# Altium PCB PHASE_SHIFTER.PcbDoc (part 1 of 2)
Units mm, origin at the board's own origin, x right, y up, seen from the top; angles counter-clockwise.
Board outline 49.45 x 41.36 mm, 4 copper layers (Top Layer, GND, signal, Bottom Layer), stack 0.746 mm thick; 108 components, 104 nets, 427 pads, 760 vias.
Unrouted connection lines stored in the file: 109.
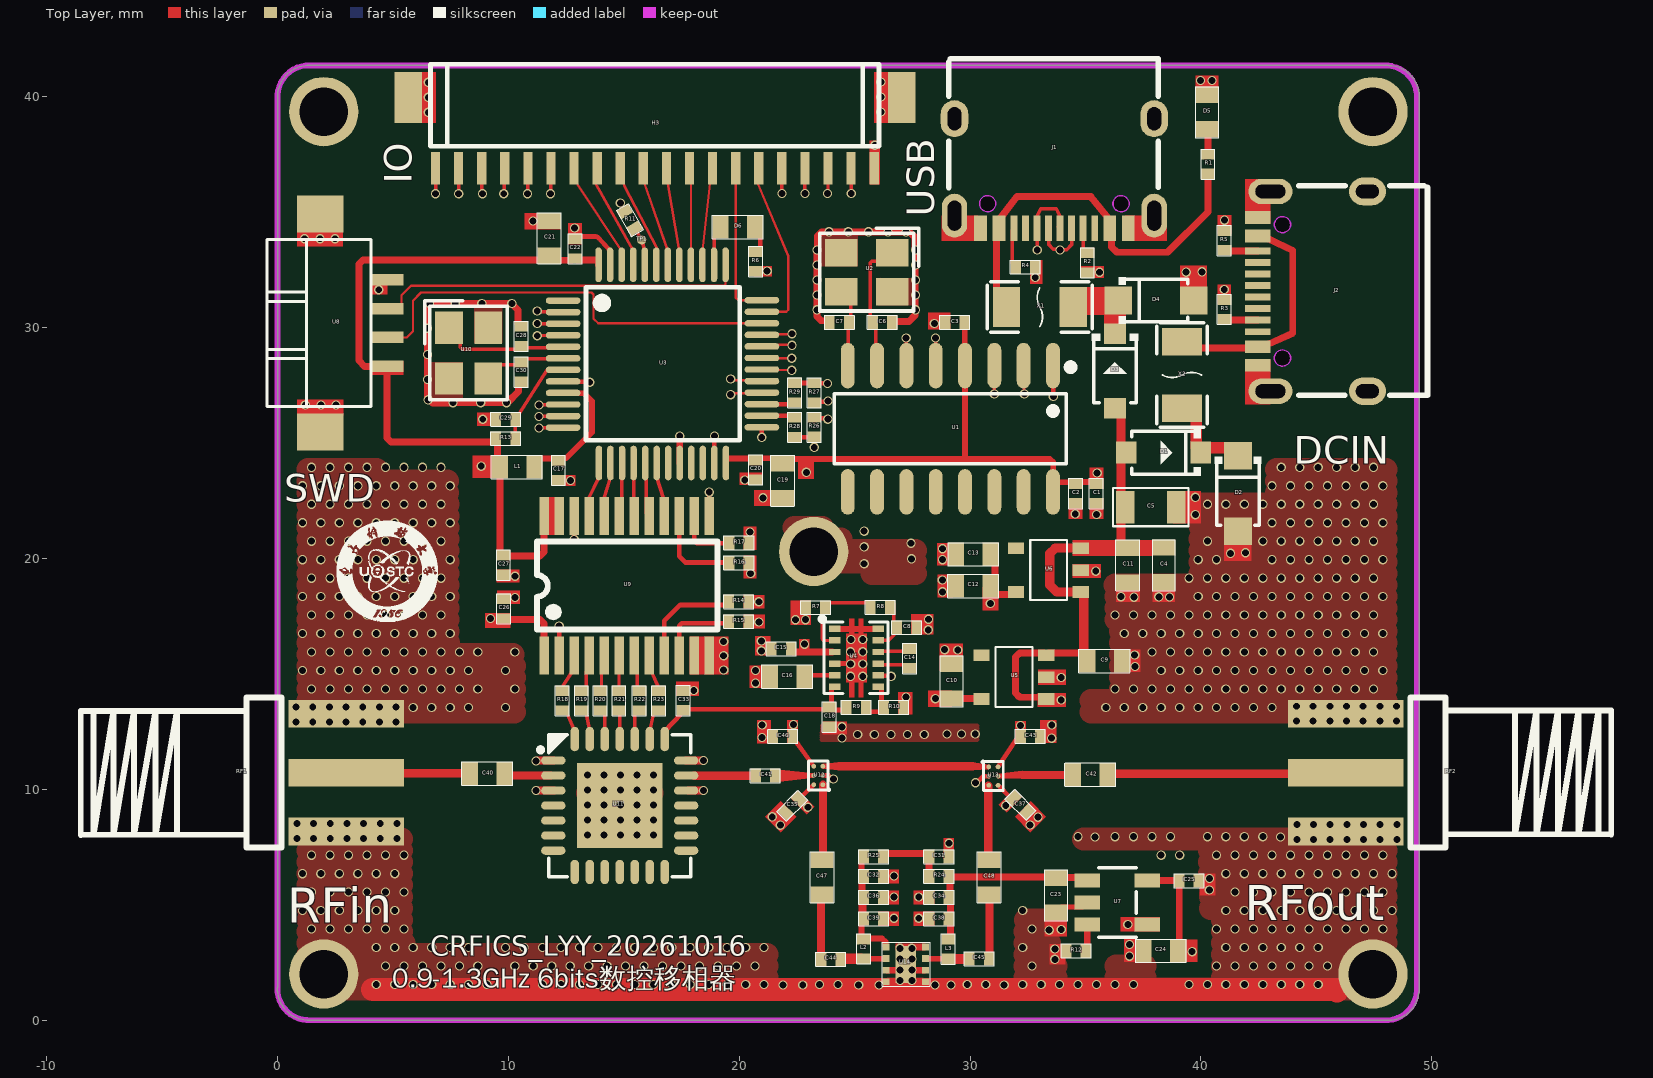
[diagram p0: Top Layer view]
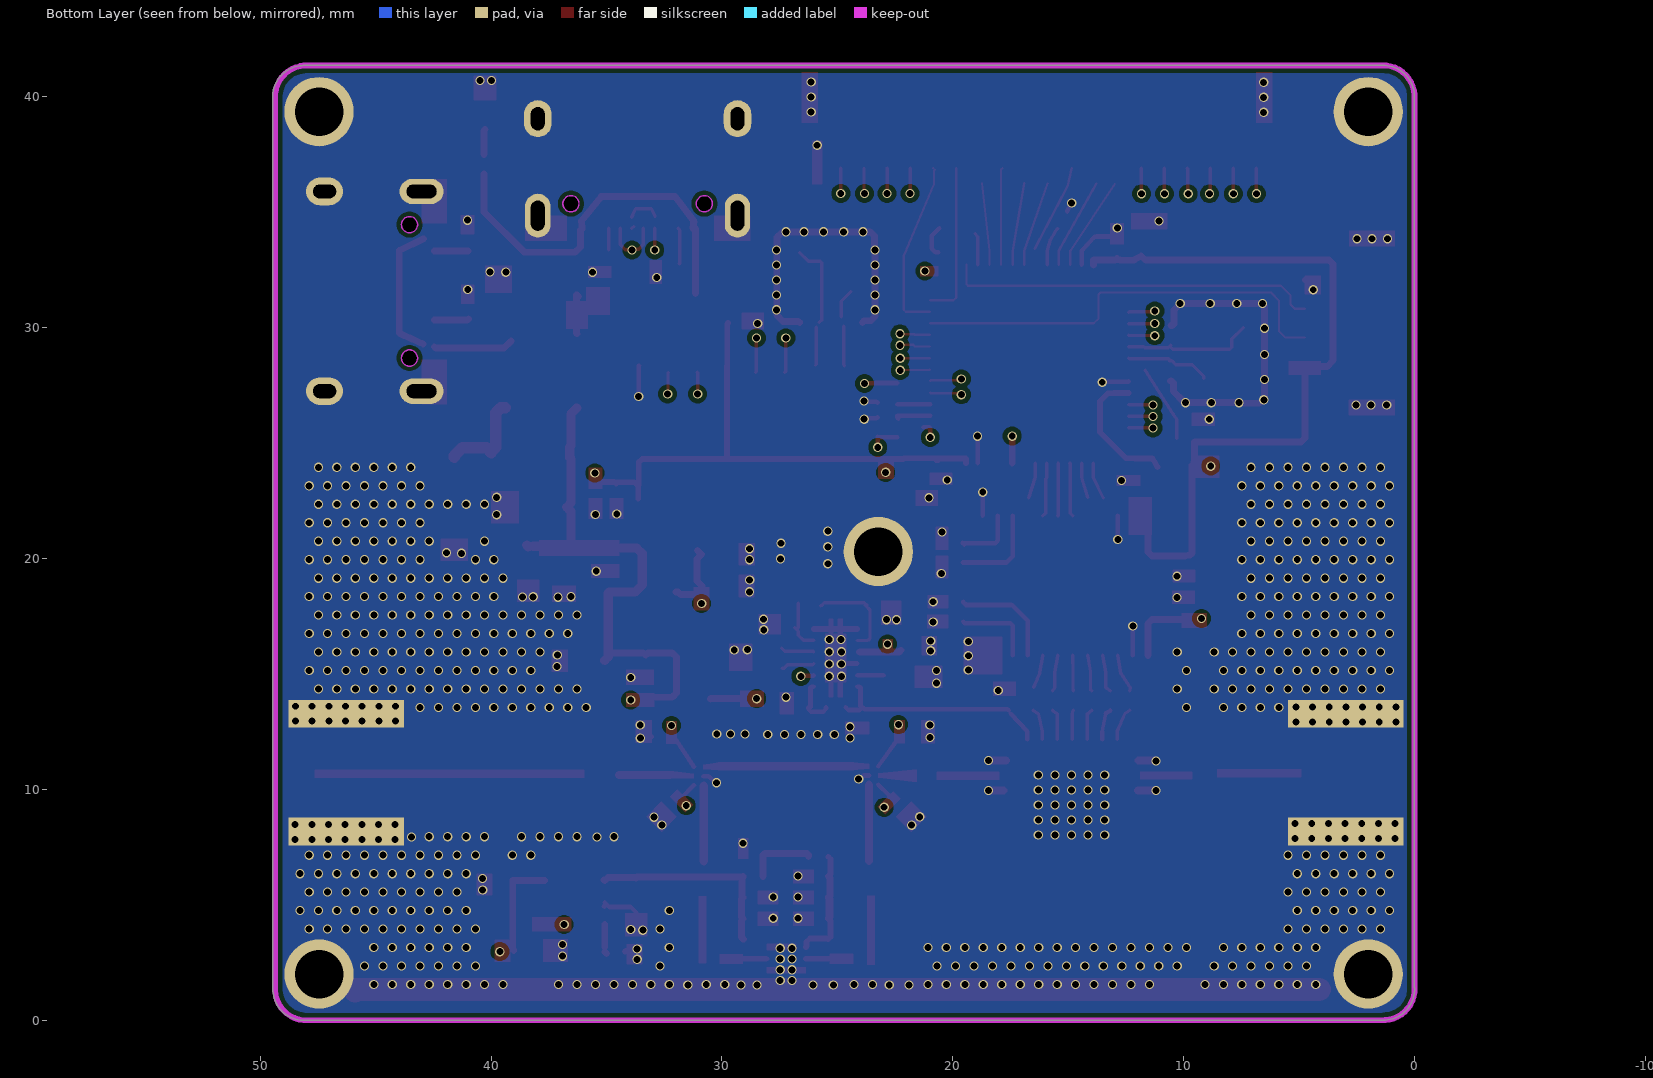
[diagram p1: Bottom Layer view, seen from below]
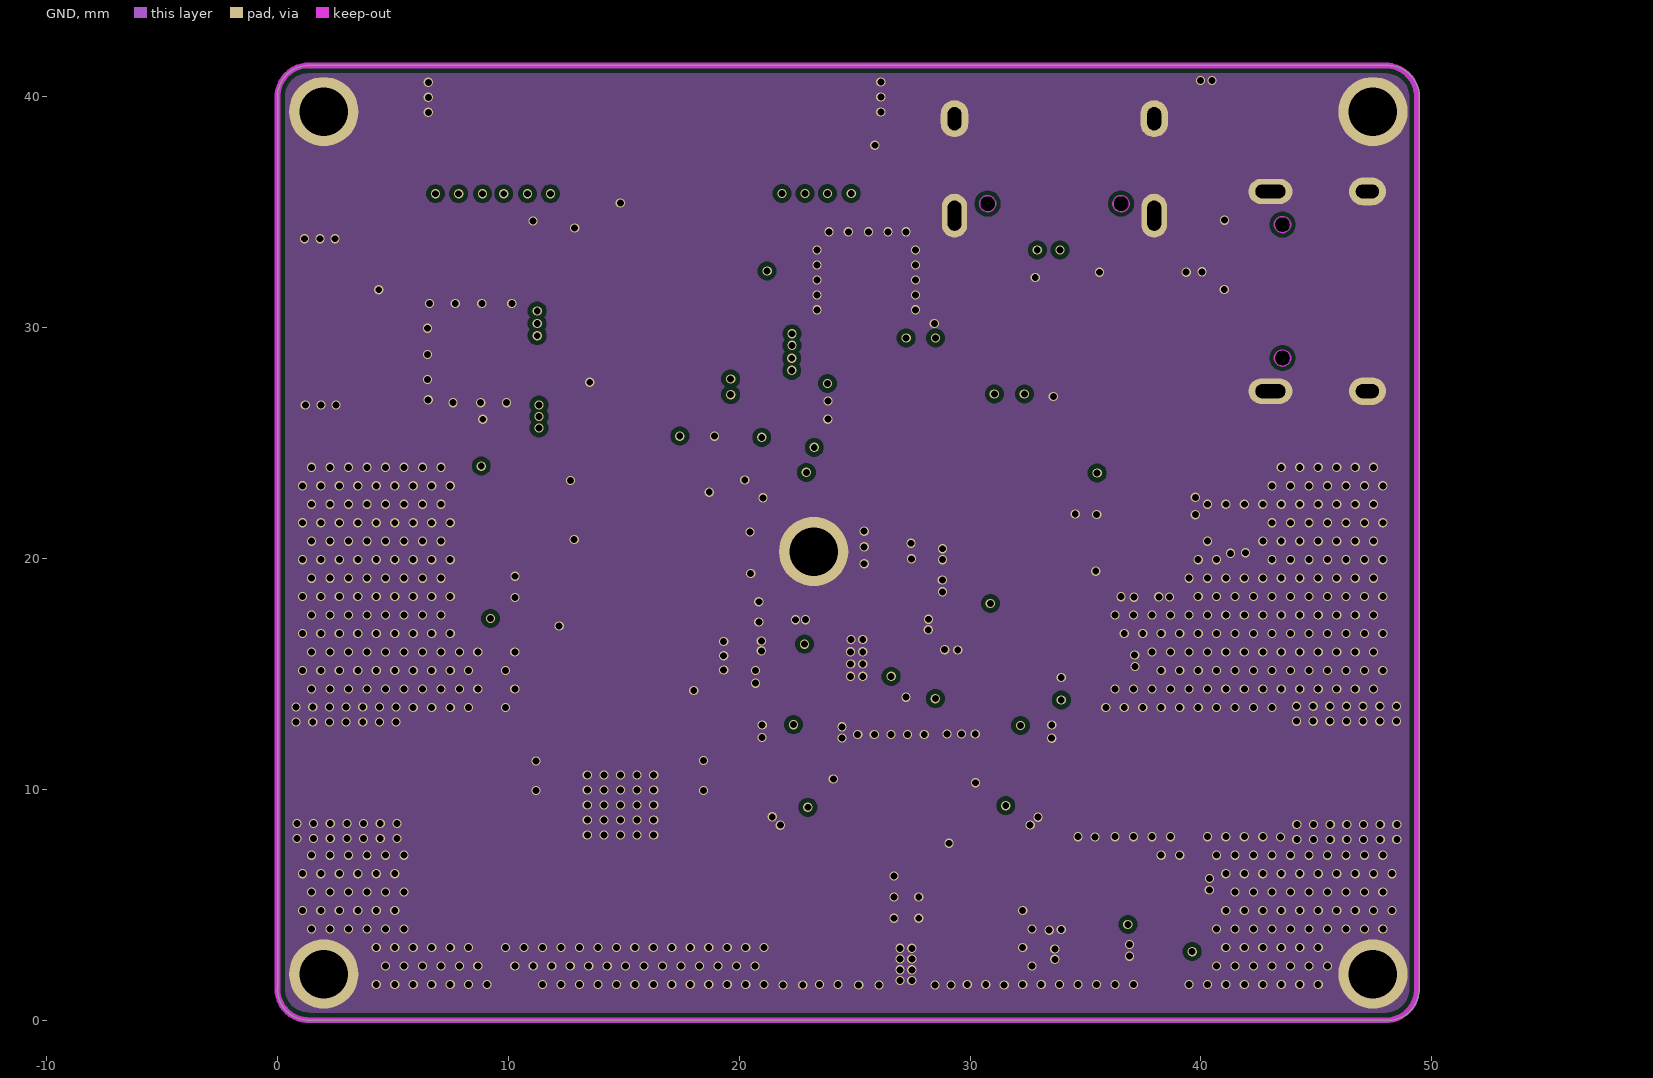
[diagram p2: GND]
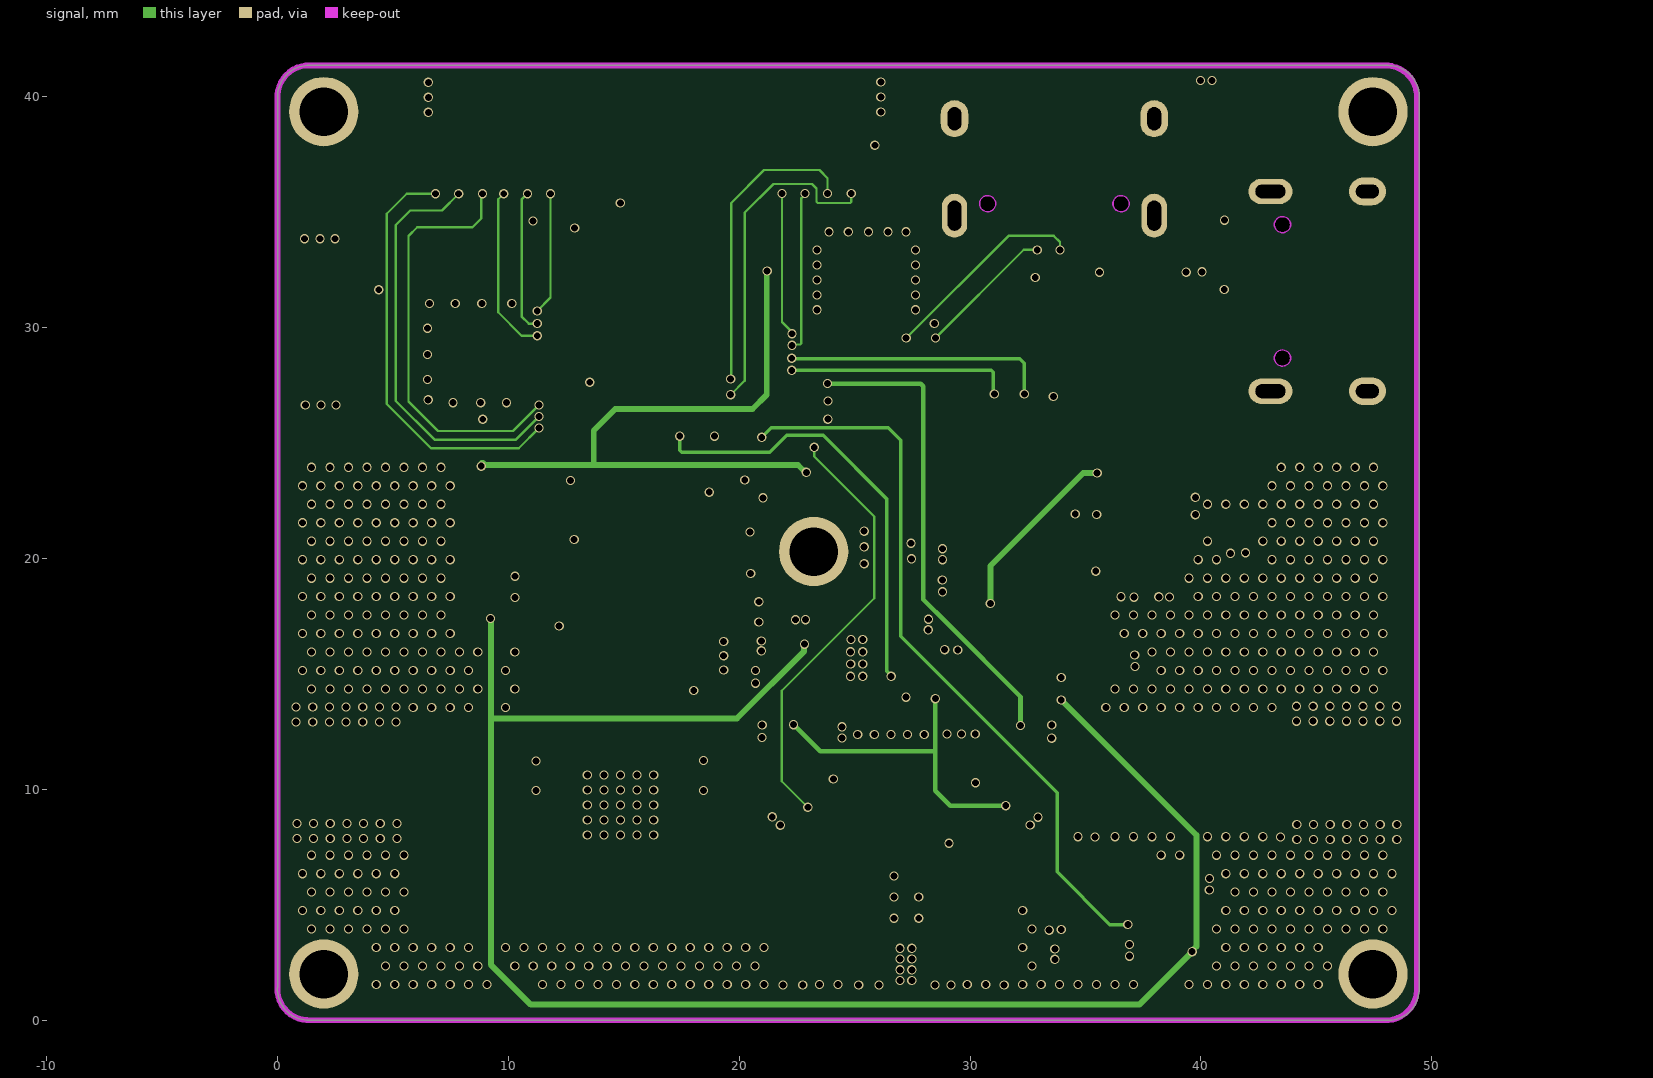
[diagram p3: signal]

## Layer stack, top to bottom
Top Solder: solder mask 0.0102, Solder Resist, Dk 3.5
Top Layer: signal copper 0.035
Dielectric 2: prepreg 0.2184, PP-023, Dk 4.5
GND: signal copper 0.018
Dielectric 1: core 0.2032, Core-024, Dk 4.6
signal: signal copper 0.018
Dielectric 3: prepreg 0.2184, PP-023, Dk 4.5
Bottom Layer: signal copper 0.035
Bottom Solder: solder mask 0.0102, Solder Resist, Dk 3.5

## Board outline
1.278,0.003 cw(c1.346,1.35) 0,1.418 0.004,1.418 0.001,40.078 0.003,40.078 cw(c1.35,40.011) 1.418,41.357 48.125,41.357 48.175,41.35 cw(c48.107,40.004) 49.453,39.936 49.45,39.936 49.45,1.275 cw(c48.104,1.343) 48.036,-0.003 48.1,0

## Design rules (kind name [scope] priority, off if disabled: settings)
Clearance Clearance_1 [InNamedPolygon('NONET_L-01_P-003')] p1: gap=0.58 ignorepadtopadclearanceinfootprint=FALSE except(0: Arc-Text Arc-Hole Track-Text Track-Hole SMDPad-Text SMDPad-Hole THPad-Text THPad-Hole Via-Text Via-Hole Fill-Text Fill-Hole Poly-Text Poly-Hole Region-Text Region-Hole Text-Text Text-Hole; 0.4: Arc-Arc Arc-Track Arc-SMDPad Arc-THPad Arc-Via Track-Track Track-SMDPad Track-THPad Track-Via SMDPad-SMDPad SMDPad-THPad SMDPad-Via THPad-THPad THPad-Via Via-Via; 0.7: Arc-Fill Arc-Poly Arc-Region Track-Fill Track-Poly Track-Region)
Clearance Clearance_2 [InNamedPolygon('NONET_L-01_P-003')] p2: gap=0.7 ignorepadtopadclearanceinfootprint=FALSE except(0: Arc-Hole Track-Hole SMDPad-Hole THPad-Hole Via-Hole Fill-Hole Poly-Hole Region-Hole Text-Hole; 0.3: Arc-Via Track-Via SMDPad-Via THPad-Via Via-Via)
Clearance GND_Bottom [InNamedPolygon('GND_Bottom')] p3: gap=0.2 ignorepadtopadclearanceinfootprint=TRUE
Clearance Ch341_3V3 [InNamedPolygon('CH341_3V3')] p4: gap=0.5 ignorepadtopadclearanceinfootprint=TRUE
Clearance VSS [InNamedPolygon('VSS')] p5: gap=0.2 ignorepadtopadclearanceinfootprint=TRUE except(0.6: Arc-Fill Arc-Poly Arc-Region Track-Fill Track-Poly Track-Region Fill-Fill Fill-Poly Fill-Region Poly-Poly Poly-Region Region-Region)
Clearance GND [InNamedPolygon('GND_Ploy')] p6: gap=0.4 ignorepadtopadclearanceinfootprint=TRUE except(0.8: Arc-Fill Arc-Poly Arc-Region Track-Fill Track-Poly Track-Region Fill-Fill Fill-Poly Fill-Region Poly-Poly Poly-Region Region-Region)
Clearance DC_GND [InNamedPolygon('DC_Ploy')] p7: gap=0.4 ignorepadtopadclearanceinfootprint=TRUE except(0.8: Arc-Fill Arc-Poly Arc-Region Track-Fill Track-Poly Track-Region Fill-Fill Fill-Poly Fill-Region Poly-Poly Poly-Region Region-Region)
Clearance LNA [InNamedPolygon('LNA')] p8: gap=0.102 ignorepadtopadclearanceinfootprint=TRUE except(0.2: Arc-Arc Arc-Track Track-Track SMDPad-Fill SMDPad-Poly SMDPad-Region THPad-Fill THPad-Poly THPad-Region; 0.8: Arc-Fill Arc-Poly Arc-Region Track-Fill Track-Poly Track-Region Via-Fill Via-Poly Via-Region Fill-Fill Fill-Poly Fill-Region Poly-Poly Poly-Region Region-Region)
Clearance Ploy [InPolygon] p9: gap=0.2 ignorepadtopadclearanceinfootprint=TRUE
Clearance Diff [InNetClass('Diff')] p10: gap=0.152 ignorepadtopadclearanceinfootprint=TRUE
Clearance [All] p11: gap=0.1 ignorepadtopadclearanceinfootprint=TRUE except(0.102: SMDPad-SMDPad; 0.203: SMDPad-THPad)
ComponentClearance [All] p1: gap=0.1 collisioncheckmode=3 verticalgap=0.1 showdistances=FALSE donotcheckwithout3dbody=TRUE
DiffPairsRouting [All] p1: maxlimit=10 minlimit=0.1 mostfreqgap=0.178 toplayer_minwidth=0.128 toplayer_maxwidth=1.016 toplayer_prefwidth=0.422 midlayer1_minwidth=0.128 midlayer1_maxwidth=1.016 midlayer1_prefwidth=0.422 midlayer2_maxgap=0.254 midlayer2_minwidth=0.128 midlayer2_maxwidth=0.381 midlayer2_prefwidth=0.29 bottomlayer_minwidth=0.128 bottomlayer_maxwidth=1.016 bottomlayer_prefwidth=0.422 maxuncoupledlength=12.7
HoleSize [All] p1: absolutevalues=TRUE maxlimit=5 minlimit=0.025 maxpercent=80.000 minpercent=20.000
HoleToHoleClearance [All] p1: gap=0 allowstackedmicrovias=TRUE
MatchedLengths [InNetClass('DRM')] p1: tolerance=1.27 checknetsindiffpair=FALSE checkdiffpairvsdiffpair=TRUE checkxsignals=TRUE checkothers=TRUE
MinimumSolderMaskSliver [All] p1: minsoldermaskwidth=0
PlaneConnect [All] p1: planeconnectstyle=Direct reliefexpansion=0.508 reliefentries=4 reliefconductorwidth=0.254 reliefairgap=0.254
PolygonConnect [All] p1: connectstyle=Direct reliefconductorwidth=0.254 reliefentries=4 polygonreliefangle="90 Angle" airgapwidth=0.254
RoutingVias [All] p1: holewidth=0.711 width=1.27 viastyle="Through Hole" minholewidth=0.2 minwidth=0.1 maxholewidth=2.4 maxwidth=5
SilkToSilkClearance [All] p1: silktosilkclearance=0
SilkToSolderMaskClearance [IsPad] p1: minsilkscreentomaskgap=0 clearancetoexposedcopper=TRUE
SolderMaskExpansion [IsVia] p1: expansion=0.102 istentingtop=TRUE
SupplyNets "Schematic Supply Nets_1" [InNet('GND')] p1: voltage=0.000
SupplyNets "Schematic Supply Nets" [InNet('3V3')] p2: voltage=0.000
Width [All] p1: maxlimit=5 minlimit=0.1 preferedwidth=0.1 midlayer1_maxwidth=2 midlayer2_maxwidth=0.254 bottomlayer_maxwidth=0.254 minimp=50.000000 maximp=50.000000 favimp=50.000000
22 further rules are at their usual default settings.

## Components (designator, comment, footprint, x,y, rotation, side; value= is the part's Value field where it differs from the comment)
C1 "0.1uF" 0402_Z 35.475,22.825 r270 top value="20pF  NP0"
C2 "0.1uF" 0402_Z 34.581,22.828 r270 top value="20pF  NP0"
C3 "10nF" 0402_Z 29.35,30.222 r180 top value="20pF  NP0"
C4 "10uF" 0603_Z 38.375,19.705 r270 top value="20pF  NP0"
C5 "47uF" 0805 37.825,22.225 r180 top value="20pF  NP0"
C6 "33pF" 0402_Z 26.211,30.222 r180 top value="20pF  NP0"
C7 "33pF" 0402_Z 24.328,30.234 r0 top value="20pF  NP0"
C8 "2.2uF" 0402_Z 27.262,17.003 r180 top value="20pF  NP0"
C9 "1uF" 0603_Z 35.812,15.584 r180 top value=100pF
C10 "1uF" 0603_Z 29.175,14.675 r270 top value=100pF
C11 "1uF" 0603_Z 36.84,19.725 r90 top value=100pF
C12 "100nF" 0603_Z 30.15,18.795 r0 top value=100pF
C13 "1uF" 0603_Z 30.15,20.17 r0 top value=100pF
C14 "1uF" 0402_Z 27.39,15.675 r270 top value="20pF  NP0"
C15 "2.2uF" 0402_Z 21.826,16.088 r180 top value="20pF  NP0"
C16 "4.7uF" 0603_Z 22.071,14.898 r180 top value="20pF  NP0"
C17 "1uF" 0402_Z 12.175,23.825 r270 top value="20pF  NP0"
C18 "2.2uF" 0402_Z 23.9,13.125 r90 top value="20pF  NP0"
C19 "4.7uF" 0603_Z 21.884,23.388 r90 top value="20pF  NP0"
C20 "100nF" 0402_Z 20.71,23.829 r90 top value="20pF  NP0"
C21 "4.7uF" 0603_Z 11.783,33.882 r90 top value="20pF  NP0"
C22 "100nF" 0402_Z 12.885,33.411 r90 top value="20pF  NP0"
C23 "1uF" 0603_Z 33.7,5.4 r270 top value=100pF
C24 "10uF" 0603_Z 38.25,3.025 r180 top value=100pF
C25 "0.1uF" 0402_Z 39.475,6.05 r0 top value=100pF
C26 "100nF" 0402_Z 9.806,17.834 r270 top value="20pF  NP0"
C27 "100nF" 0402_Z 9.781,19.709 r90 top value="20pF  NP0"
C28 "10pF" 0402_Z 10.562,29.634 r270 top value="20pF  NP0"
C29 "1uF" 0402_Z 9.891,26.031 r180 top value="20pF  NP0"
C30 "10pF" 0402_Z 10.55,28.069 r90 top value="20pF  NP0"
C31 "100 pF" 0402_Z 28.661,7.079 r180 top value=100pF
C32 "100nF" 0402_Z 25.811,6.242 r0 top value=100pF
C33 "10nF" 0402_Z 17.581,13.859 r270 top value="20pF  NP0"
C34 "100nF" 0402_Z 28.661,5.317 r180 top value=100pF
C35 "100 pF" 0402_Z 22.306,9.291 r225 top value=100pF
C36 "1nF" 0402_Z 25.811,5.329 r0 top value=100pF
C37 "100 pF" 0402_Z 32.172,9.336 r315 top value=100pF
C38 "100 pF" 0402_Z 28.661,4.392 r180 top value=100pF
C39 "100 pF" 0402_Z 25.811,4.404 r0 top value=100pF
C40 "100nF" 0603_Z 9.1,10.675 r0 top value="20pF  NP0"
C41 "100 pF" 0402_Z 21.125,10.6 r0 top value=100pF
C42 "100nF" 0603_Z 35.225,10.625 r0 top value="20pF  NP0"
C43 "100 pF" 0402_Z 32.603,12.302 r0 top value=100pF
C44 "100 pF" 0402_Z 23.961,2.642 r0 top value=100pF
C45 "100 pF" 0402_Z 30.386,2.667 r0 top value=100pF
C46 "100 pF" 0402_Z 21.899,12.288 r180 top value=100pF
C47 "NC" 0603_Z 23.6,6.2 r90 top
C48 "NC" 0603_Z 30.825,6.2 r90 top
D1 "B5819W" BW5819W 38.378,24.586 r0 top
D2 "SMF5.0A" SMF5.0A 41.601,22.813 r270 top
D3 "B5819W" BW5819W 36.275,28.125 r90 top
D4 "SMF5.0A" SMF5.0A 38.048,31.173 r0 top
D5 "LED0" 0603_Z 40.25,39.325 r270 top
D6 "LED1" 0603_Z 19.95,34.35 r0 top
H3 "HEADER20" Header20 16.575,39.6 r90 top
J1 "typec_16pin" TYPEC_16PIN 33.523,37.564 r180 top
J2 "typec_16pin" TYPEC_16PIN 45.725,31.7 r90 top
L1 "bead" 0603_Z 10.362,23.972 r180 top value=33nH
L2 "18nH" 0402_Z 25.4,3.1 r270 top value=10mH
L3 "47nH" 0402_Z 29.061,3.092 r270 top value=10mH
R1 "10k" 0402_Z 40.3,37.075 r90 top
R2 "5.1k" 0402_Z 35.078,32.802 r90 top
R3 "5.1k" 0402_Z 41.019,30.8 r270 top
R4 "5.1k" 0402_Z 32.406,32.621 r180 top
R5 "5.1k" 0402_Z 41.019,33.781 r270 top
R6 "10k" 0402_Z 20.709,32.855 r90 top
R7 "310k" 0402_Z 23.3,17.886 r0 top
R8 "100k" 0402_Z 26.102,17.891 r0 top
R9 "100k" 0402_Z 25.075,13.55 r180 top
R10 "310k" 0402_Z 26.7,13.55 r180 top
R11 "10k" 0402_Z 15.25,34.65 r120 top
R12 "38k" 0402_Z 34.6,3 r180 top value=1K
R13 "10k" 0402_Z 9.873,25.206 r0 top
R14 "0" 0402_Z 19.984,18.128 r180 top
R15 "0" 0402_Z 19.984,17.263 r180 top
R16 "10k" 0402_Z 19.984,19.819 r0 top
R17 "10k" 0402_Z 19.984,20.684 r0 top
R18 "22" 0402_Z 12.331,13.834 r90 top
R19 "22" 0402_Z 13.166,13.834 r90 top
R20 "22" 0402_Z 13.976,13.834 r90 top
R21 "22" 0402_Z 14.786,13.834 r90 top
R22 "22" 0402_Z 15.671,13.834 r90 top
R23 "22" 0402_Z 16.506,13.834 r90 top
R24 "6.5k" 0402_Z 28.661,6.229 r180 top value=1K
R25 "50" 0402_Z 25.811,7.092 r0 top value=1K
R26 "2k" 0402_Z 23.257,25.7 r270 top
R27 "2k" 0402_Z 23.244,27.166 r90 top
R28 "1k" 0402_Z 22.4,25.675 r90 top
R29 "1k" 0402_Z 22.412,27.191 r270 top
RF1 "BWIPX-1-001E" SMA-SMD_BWSMA-KE-P001 2.975,10.725 r180 top
RF2 "BWIPX-1-001E" SMA-SMD_BWSMA-KE-P001 46.275,10.725 r0 top
TP1 "TP_P" TP_0.8 15.775,33.8 r45 top
U1 "CH340G" CH340G 29.146,25.621 r180 top
U2 "12MHz" CRYSTAL-SMD_4P-L3.2-W2.5-BL 25.525,32.4 r180 top
U3 "CS32F030C8T6" LQPF48 16.678,28.428 r270 top
U4 "LM27762DSSR" LM27762 25.075,15.7 r270 top
U5 "SGM2036-2.8V" SOT-23-5 31.898,14.864 r180 top
U6 "SGM2036-3.3YN5G/TR" SOT-23-5 33.395,19.5 r180 top
U7 "SGM2576" SGM2576 36.375,5.1 r0 top
U8 "HDGC1251WR-4P" J4_1.25 3.3,30.2 r270 top
U9 "AiP74LVC8T245TA24.TR" AIP74LVC8T245TA24.TR 15.125,18.825 r0 top
U10 "8MHz" CRYSTAL-SMD_4P-L3.2-W2.5-BL 8.275,28.9 r270 top
U11 "XT3301Q6" XT3301Q6 14.825,9.3 r270 top
U12 "MXD8625C" MXD8625C 23.098,10.757 r0 top
U13 "MXD8625C" MXD8625C 31.338,10.416 r180 top
U14 "FW1103" FW1103W 27.211,2.417 r270 top
X1 "Fuse" F1206 33.022,30.886 r180 top
X2 "Fuse" F1206 39.175,27.95 r90 top

## Footprints (in the part's own frame and the unit in brackets; to place one, negate y for a bottom-side part, rotate by r counter-clockwise, add the part's x,y. Pads: shape width x height; smd on the part's side, far side on the other; paste and mask are expansions set on the pad)
0402_Z [mm]
  rect 0.45x0.6 smd mask+0: 1(0.434,-0.006) 2(-0.416,-0.006)
  silkscreen extent -0.64,-0.31 0.66,0.29, body extent -0.41,-0.31 0.44,0.29, height 0.25
0603_Z [mm]
  rect 0.7x1 smd mask+0: 1(0.735,0.013) 2(-0.765,0.013)
  silkscreen extent -1.12,-0.49 1.09,0.52
0805 [mm]
  rect 0.8x1.4 smd: 1(-1.1,0) 2(1.1,0)
  silkscreen extent -1.63,-0.83 1.64,0.83
AIP74LVC8T245TA24.TR [mm]
  rect 0.4x1.65 smd: 1(-3.575,-3.023) 2(-2.925,-3.023) 3(-2.275,-3.023) 4(-1.625,-3.023) 5(-0.975,-3.023) 6(-0.325,-3.023) 7(0.325,-3.023) 8(0.975,-3.023) 9(1.625,-3.023) 10(2.275,-3.023) 11(2.925,-3.023) 12(3.575,-3.023) 13(3.575,3.023) 14(2.925,3.023) 15(2.275,3.023) 16(1.625,3.023) 17(0.975,3.023) 18(0.325,3.023) 19(-0.325,3.023) 20(-0.975,3.023) 21(-1.625,3.023) 22(-2.275,3.023) 23(-2.925,3.023) 24(-3.575,3.023)
  silkscreen extent -3.89,-1.91 3.94,1.91
BW5819W [mm] "肖特基二极管"
  rect 0.88x0.96 smd: 1(-1.61,0) 2(1.61,0)
  silkscreen extent -1.38,-1 1.6,1
CH340G [mm]
  oval 0.602x1.971 smd: 1(-4.445,-2.736) 2(-3.175,-2.736) 3(-1.905,-2.736) 4(-0.635,-2.736) 5(0.635,-2.736) 6(1.905,-2.736) 7(3.175,-2.736) 8(4.445,-2.736) 9(4.445,2.736) 10(3.175,2.736) 11(1.905,2.736) 12(0.635,2.736) 13(-0.635,2.736) 14(-1.905,2.736) 15(-3.175,2.736) 16(-4.445,2.736)
  silkscreen extent -5.36,-2.82 5.03,1.52
CRYSTAL-SMD_4P-L3.2-W2.5-BL [mm]
  rect 1.4x1.2 smd paste+0 mask+0.051: 1(-1.1,-0.85) 2(1.1,-0.85) 3(1.1,0.85) 4(-1.1,0.85)
  silkscreen extent -2.26,-1.91 2.03,1.68
F1206 [mm] "保险丝"
  rect 1.19x1.728 smd paste+0 mask+0.051: 1(-1.445,0) 2(1.445,0)
  silkscreen extent -2.27,-1.09 2.27,1.09
FW1103W [mm]
  rect 1.6x0.9 smd mask+0: 0(0,0)
  rect 0.3x0.3 smd mask+0: 1(-0.75,-0.85) 2(-0.25,-0.85) 3(0.25,-0.85) 4(0.75,-0.85) 5(0.75,0.85) 6(0.25,0.85) 7(-0.25,0.85) 8(-0.75,0.85)
  round 0.1 on Top Overlay mask+0: ""(-1.036,-1.113)
  Top Layer region: -0.901,-0.45 -0.601,-0.45 -0.601,0.85 -0.901,0.85
  Top Layer region: -0.901,-0.45 -0.618,-0.45 -0.618,0.45 -0.901,0.45
  Top Layer region: 0.615,-0.45 0.898,-0.45 0.898,0.451 0.615,0.451
  Top Layer region: 0.1,-0.849 0.4,-0.849 0.4,0.851 0.1,0.851
  Top Layer region: 0.6,-0.85 0.9,-0.85 0.9,0.85 0.6,0.85
  silkscreen extent -0.96,-1.03 0.94,1.03
Header20 [mm]
  rect 1.4x0.4 smd: 1(-2.692,9.73) 2(-2.692,8.73) 3(-2.692,7.73) 4(-2.692,6.73) 5(-2.692,5.73) 6(-2.692,4.73) 7(-2.692,3.73) 8(-2.692,2.73) 9(-2.692,1.73) 10(-2.692,0.73) 11(-2.692,-0.27) 12(-2.692,-1.27) 13(-2.692,-2.27) 14(-2.692,-3.27) 15(-2.692,-4.27) 16(-2.692,-5.27) 17(-2.692,-6.27) 18(-2.692,-7.27) 19(-2.692,-8.27) 20(-2.692,-9.27)
  rect 2.2x1.2 smd: 21(0.37,-10.47) 22(0.37,10.913)
  silkscreen extent -1.74,-9.48 1.81,9.95
J4_1.25 [mm]
  rect 0.5x1.4 smd: 1(-1.875,1.45) 2(-0.625,1.45) 3(0.625,1.45) 4(1.875,1.45)
  rect 1.6x2 smd: 5(-4.72,-1.45) 6(4.72,-1.45)
  silkscreen extent -3.62,-3.75 3.61,0.75
LM27762 [mil]
  rect 11x19.7 smd: 1(-49.21,-37) 2(-29.53,-37) 3(-9.84,-37) 4(9.84,-37) 5(29.53,-37) 6(49.21,-37) 7(49.21,37) 8(29.53,37) 9(9.84,37) 10(-9.84,37) 11(-29.53,37) 12(-49.21,37)
  round 1 smd: 13(0,0)
  Top Layer region: -41.34,17.72 -41.34,11.81 -66.93,11.81 -66.93,3.94 -41.34,3.94 -41.34,-3.94 -66.93,-3.94 -66.93,-11.81 -41.34,-11.81 -41.34,-17.72 41.34,-17.72 41.34,-11.81 66.93,-11.81 66.93,-3.94 41.34,-3.94 41.34,3.94 66.93,3.94 66.93,11.81 41.34,11.81 41.34,17.72 -41.34,17.72
  silkscreen extent -69,-61 61,54
LQPF48 [mm]
  oval 0.28x1.5 smd: 1(-2.743,-4.305) 2(-2.243,-4.305) 3(-1.742,-4.305) 4(-1.242,-4.305) 5(-0.742,-4.305) 6(-0.241,-4.305) 7(0.257,-4.305) 8(0.757,-4.305) 9(1.257,-4.305) 10(1.758,-4.305) 11(2.258,-4.305) 12(2.758,-4.305) 25(2.743,4.305) 26(2.243,4.305) 27(1.742,4.305) 28(1.242,4.305) 29(0.742,4.305) 30(0.241,4.305) 31(-0.257,4.305) 32(-0.757,4.305) 33(-1.257,4.305) 34(-1.758,4.305) 35(-2.258,4.305) 36(-2.758,4.305)
  oval 1.5x0.28 smd: 13(4.293,-2.756) 14(4.293,-2.256) 15(4.293,-1.755) 16(4.293,-1.255) 17(4.293,-0.754) 18(4.293,-0.254) 19(4.293,0.244) 20(4.293,0.744) 21(4.293,1.245) 22(4.293,1.745) 23(4.293,2.245) 24(4.293,2.746) 37(-4.293,2.731) 38(-4.293,2.23) 39(-4.293,1.73) 40(-4.293,1.229) 41(-4.293,0.729) 42(-4.293,0.229) 43(-4.293,-0.269) 44(-4.293,-0.77) 45(-4.293,-1.27) 46(-4.293,-1.77) 47(-4.293,-2.271) 48(-4.293,-2.771)
  silkscreen extent -3.33,-3.31 3.3,3.34
MXD8625C [mil]
  round 8 smd mask+3: 1(20.75,-21.93) 2(20.75,-6.18) 3(20.75,9.57) 4(5,9.57) 5(5,-6.18) 6(5,-21.93)
  silkscreen extent -4,-32 33,18
SGM2576 [mm] "功率开关"
  rect 1.1x0.6 smd paste+0 mask+0.05: 1(-1.3,0.95) 2(-1.3,0) 3(-1.3,-0.95) 4(1.3,-0.95) 5(1.3,0.95)
  silkscreen extent -0.81,-1.51 0.82,1.51
SMA-SMD_BWSMA-KE-P001 [mm]
  rect 5x1.2 smd mask+0.051: 1(0,0) 2(0,2.55) 3(0,-2.55)
  rect 5x1.2 smd far side mask+0.051: 3(0,2.55) 4(0,-2.55)
  silkscreen extent 2.79,-3.25 11.5,3.25
SMF5.0A [mm]
  rect 1.2x1.2 smd: 1(-1.635,0) 2(1.635,0)
  silkscreen extent -1.6,-1 1.38,1
SOT-23-5 [mm]
  rect 0.7x0.5 smd: 1(-1.4,0.95) 2(-1.4,0) 3(-1.4,-0.95) 4(1.4,-0.95) 5(1.4,0.95)
  silkscreen extent -0.81,-1.3 0.79,1.3
TP_0.8 [mm]
  round 0.4 smd: 1(0,0)
TYPEC_16PIN [mm]
  oval 1.2x1.6 hole 0.6 slot 1 at 90 deg paste-2539.97 mask+0.05: 13(-4.452,-1.486) 14(4.198,-1.486)
  oval 1.1x1.9 hole 0.6 slot 1.3 at 90 deg paste-2539.97 mask+0.05: 13(-4.452,2.714) 14(4.198,2.714)
  rect 0.55x1.1 smd paste+0 mask+0.05: A1B12(-3.327,3.264) A4B9(-2.527,3.264) B1A12(3.073,3.264) B4A9(2.273,3.264)
  rect 0.3x1.1 smd paste+0 mask+0.05: A5(-1.377,3.264) A6(-0.377,3.264) A7(0.123,3.264) A8(1.123,3.264) B5(1.623,3.264) B6(0.623,3.264) B7(-0.877,3.264) B8(-1.877,3.264)
  Keep-Out Layer board cut-out: -2.667,2.194 -2.667,2.124 -2.72,1.996 -2.819,1.897 -2.947,1.844 -3.087,1.844 -3.215,1.897 -3.314,1.996 -3.367,2.124 -3.367,2.194 -3.367,2.264 -3.314,2.392 -3.215,2.491 -3.087,2.544 -2.947,2.544 -2.819,2.491 -2.72,2.392 -2.667,2.264 -2.667,2.194 -2.667,2.194
  Keep-Out Layer board cut-out: 3.113,2.194 3.113,2.124 3.06,1.996 2.961,1.897 2.833,1.844 2.694,1.844 2.565,1.897 2.466,1.996 2.413,2.124 2.413,2.194 2.413,2.264 2.466,2.392 2.565,2.491 2.694,2.544 2.833,2.544 2.961,2.491 3.06,2.392 3.113,2.264 3.113,2.194 3.113,2.194
  Keep-Out Layer circle w0.003: c-3.017,2.194 r0.35
  Keep-Out Layer circle w0.003: c2.763,2.194 r0.35
  Keep-Out Layer region: -2.667,2.194 -2.667,2.124 -2.72,1.996 -2.819,1.897 -2.947,1.844 -3.087,1.844 -3.215,1.897 -3.314,1.996 -3.367,2.124 -3.367,2.194 -3.367,2.264 -3.314,2.392 -3.215,2.491 -3.087,2.544 -2.947,2.544 -2.819,2.491 -2.72,2.392 -2.667,2.264 -2.667,2.194 -2.667,2.194
  Keep-Out Layer region: -2.667,2.194 -2.676,2.116 -2.702,2.042 -2.743,1.976 -2.799,1.92 -2.865,1.879 -2.939,1.853 -3.017,1.844 -3.095,1.853 -3.169,1.879 -3.235,1.92 -3.291,1.976 -3.332,2.042 -3.358,2.116 -3.367,2.194 -3.358,2.272 -3.332,2.346 -3.291,2.412 -3.235,2.468 -3.169,2.509 -3.095,2.535 -3.017,2.544 -2.939,2.535 -2.865,2.509 -2.799,2.468 -2.743,2.412 -2.702,2.346 -2.676,2.272 -2.667,2.194
  Keep-Out Layer region: 3.113,2.194 3.113,2.124 3.06,1.996 2.961,1.897 2.833,1.844 2.694,1.844 2.565,1.897 2.466,1.996 2.413,2.124 2.413,2.194 2.413,2.264 2.466,2.392 2.565,2.491 2.694,2.544 2.833,2.544 2.961,2.491 3.06,2.392 3.113,2.264 3.113,2.194 3.113,2.194
  Keep-Out Layer region: 3.113,2.194 3.104,2.116 3.078,2.042 3.037,1.976 2.981,1.92 2.915,1.879 2.841,1.853 2.763,1.844 2.685,1.853 2.611,1.879 2.545,1.92 2.489,1.976 2.448,2.042 2.422,2.116 2.413,2.194 2.422,2.272 2.448,2.346 2.489,2.412 2.545,2.468 2.611,2.509 2.685,2.535 2.763,2.544 2.841,2.535 2.915,2.509 2.981,2.468 3.037,2.412 3.078,2.346 3.104,2.272 3.113,2.194
  silkscreen extent -4.63,-4.09 4.45,1.49
XT3301Q6 [mm] "0.9-1.3GHz移相器"
  oval 0.364x1.055 smd paste-100 mask+0.051: 1(-1.95,-2.878) 2(-1.3,-2.878) 3(-0.65,-2.878) 4(0,-2.878) 5(0.65,-2.878) 6(1.3,-2.878) 7(1.95,-2.878) 15(1.95,2.878) 16(1.3,2.878) 17(0.65,2.878) 18(0,2.878) 19(-0.65,2.878) 20(-1.3,2.878) 21(-1.95,2.878)
  oval 1.055x0.364 smd paste-100 mask+0.051: 8(2.878,-1.95) 9(2.878,-1.3) 10(2.878,-0.65) 11(2.878,0) 12(2.878,0.65) 13(2.878,1.3) 14(2.878,1.95) 22(-2.878,1.95) 23(-2.878,1.3) 24(-2.878,0.65) 25(-2.878,0) 26(-2.878,-0.65) 27(-2.878,-1.3) 28(-2.878,-1.95)
  rect 3.7x3.7 smd paste-100 mask+0.051: 29(0,0)
  silkscreen extent -3.08,-3.53 3.08,3.08

## Part data
C1 C2 C3 C4 C5 C6 C7 C8 C14 C15 C16 C17 C18 C19 C20 C21 C22 C26 C27 C28 C29 C30 C33 C40 C42: library part CAP, "0402"
C9 C10 C11 C12 C13 C23 C24 C25 C31 C32 C34 C35 C36 C37 C38 C39 C41 C43 C44 C45 C46: library part Cap, "Capacitor", LatestRevisionDate=17-Jul-2002, LatestRevisionNote="Re-released for DXP Platform.", PackageDescription="Radial Cap, Thru-Hole; 2 Leads; 0.3 in Pin Spacing", PackageReference=RAD-0.3, Published=8-Jun-2000, Publisher="Altium Limited"
C47 C48: library part Cap_NC
D1 D3: "肖特基二极管"
D5: "Typical INFRARED GaAs LED", LatestRevisionDate=08-Jul-2005, LatestRevisionNote="Mech Layer 1 removed.", PackageDescription="LED; 2 Leads", PackageReference=LED-0, Published=8-Jun-2000, Publisher="Altium Limited"
D6: library part LED0, "Typical INFRARED GaAs LED", LatestRevisionDate=08-Jul-2005, LatestRevisionNote="Mech Layer 1 removed.", PackageDescription="LED; 2 Leads", PackageReference=LED-0, Published=8-Jun-2000, Publisher="Altium Limited"
L1: library part INDUCTOR1_1, "INDUCTOR"
L2 L3: library part Inductor, "Inductor", Code_IEC=1005, Code_JEITA=0402, LatestRevisionDate=29-May-2009, LatestRevisionNote="IPC-7351 Footprint Added.", PackageDescription="Chip Inductor", PackageReference=0402-A, Published=8-Jun-2000, Publisher="Altium Limited"
R1 R2 R3 R4 R5 R6 R7 R8 R9 R10 R11 R13 R14 R15 R16 R17 R18 R19 R20 R21 R22 R23 R26 R27 R28 R29: library part Res3, "Resistor", LatestRevisionDate=04-Mar-2005, LatestRevisionNote="PCB Footprint replaced.", PackageReference=J1-0603, Published=8-Jun-2000, Publisher="Altium Limited"
R12 R24 R25: library part Res1, "Resistor", LatestRevisionDate=17-Jul-2002, LatestRevisionNote="Re-released for DXP Platform.", PackageDescription="Axial Device, Thru-Hole; 2 Leads; 0.3 in Pin Spacing", PackageReference=AXIAL-0.3, Published=8-Jun-2000, Publisher="Altium Limited"
U2 U10: library part "XTAL 3225", PCB DECAL=3225, Source_Path="E:\LI LELE\DESIGN KIT\DESIGN KIT_ESP8089_DEMO\ESP8089_DEMO.DSN"
U5: library part sgm2036
U6: library part LDO_ADJ_SGM2036, "0.8V-5V可调输出线性稳压器", Designer=U?, Device=SGM2036-3.3YN5G/TR, Symbol=SGM2036-3.3YN5G/TR
U8: library part MX1.25_弯针, "复旦微单片机程序下载接口", JLCPCB Part Class="Extended Part", LCSC Part Name="MX1.25弯针 4P", Manufacturer=HDGC(华德共创), Add into BOM=yes, Convert to PCB=yes, Datasheet=https://atta.szlcsc.com/upload/public/pdf/source/20220916/6B39EFECC0008CEF03BA0E93409F6DCC.pdf, Device=HDGC1251WR-4P, Manufacturer Part=HDGC1251WR-4P, Name=HDGC1251WR-4P, Supplier=LCSC, Supplier Footprint=直插,P=1.25mm, Supplier Part=C5175205, Symbol=HDGC1251WR-4P
U9: "具有三态输出的8位双电源转换收发器，可实现双向电平转换"
X1 X2: CURRENT=1, RESISTANCE=1m, SimulationGenericComponent=True

## Free pads (board coordinates)
  round 3 hole 2.1 mask+0.102: ""(2.003,2) ""(2.003,39.357) ""(23.225,20.3) ""(47.45,2) ""(47.45,39.357)

## Via types
v1: diameter 0.4, hole 0.3, Top Layer to Bottom Layer, tented both sides, 760 vias

## Nets (pads, with @x,y where several pads share a name; then routed paths per layer and width w, separated by ;. In a path a pad name is that pad's centre, name@x,y a point inside that pad or via, vN(x,y) a via of type N, cw(c..) or ccw(c..) an arc to the next point about the centre after c; other vN are vias at no path point)
3V3: C1.2 C2.2 C3.2 C12.1 C13.1 C19.1 C20.1 C21.2 C22.2 C27.1 L1.1 R6.2 R13.2 U1.4 U1.16 U3.24 U3.48 U6.5 U8.4 U9.23 U9.24 | length 97.5
  Top Layer w0.25: U3.24@19.424,24.136 19.424,24.321 19.438,24.335 20.643,24.335 C20.1@20.715,24.263 ; C20.1@20.631,24.258 20.711,24.338 22.124,24.338 22.156,24.307 22.633,24.307 22.802,23.952 22.906,23.848 v1(22.906,23.731) ; 22.898,23.998 22.898,24.086 23.124,24.312 29.781,24.312 ; C3.2@29.735,30.196 29.773,30.158 29.773,28.364 U1.4@29.781,28.356 29.781,24.313 33.454,24.313 33.601,24.166 U1.16@33.601,23.184 ; U1.16@33.62,22.589 33.62,23.142 33.783,23.305 34.515,23.305 C2.2@34.576,23.243 34.648,23.316 35.394,23.316 C1.2@35.469,23.241
  Top Layer w0.3: U8.4@4.75,28.325 3.775,28.325 3.525,28.575 3.525,32.752 3.701,32.928 11.655,32.928 11.837,33.11 12.187,32.92 12.741,32.92 C22.2@12.891,32.995 12.958,32.928 13.897,32.928 13.907,32.918 U3.48@13.907,32.721 ; U8.4@4.75,28.325 4.75,25.218 4.926,25.042 9.528,25.042 9.528,24.058 L1.1@9.551,24.036 ; L1.1@9.551,24.2 L1.1@9.551,24.036 ; L1.1@9.628,23.959 L1.1@9.551,24.036 ; L1.1@9.646,24.04 9.646,20.218 9.721,20.143 C27.1@9.786,20.143 ; C27.1@9.925,20.109 11.374,20.109 11.55,20.285 U9.24@11.55,21.848 ; C12.1@30.8,18.447 31.793,18.447 31.895,18.55 U6.5@31.995,18.55 ; C12.1@30.86,18.808 31.085,19.033 31.085,19.333 31.086,19.334 C13.1@31.086,19.982 ; C13.1@31.036,20.032 C13.1@30.885,20.183 C13.1@31.053,20.351
  signal w0.254: v1@8.85,24.15 8.89,24.15 8.985,24.055 13.7,24.055 22.544,24.055 22.867,23.731 v1(22.906,23.731) ; 13.7,24.055 13.7,25.546 14.629,26.475 20.576,26.475 21.19,27.088 21.19,32.429 v1(21.21,32.45) ; v1(30.877,18.051) 30.877,19.677 31.967,20.767 34.903,23.703 v1(35.505,23.703)
  other v1: 8.825,24
5V: C4.2 C5.2 C9.1 C11.1 C15.2 C24.2 C25.2 C26.1 D1.1 D3.1 U4.3 U5.1 U5.3 U6.1 U6.3 U7.5 U9.1 | length 108
  Top Layer w0.3: C26.1@9.939,17.366 11.374,17.366 11.55,17.19 U9.1@11.55,15.802 ; C15.2@22.243,16.027 22.318,15.952 U4.3@24.035,15.952 ; 32.922,15.914 32.151,15.914 31.975,15.739 31.975,14.165 32.151,13.99 33.1,13.99 33.129,13.96 U5.1@33.129,13.845 ; 32.923,15.914 33.198,15.914 U5.3@33.298,15.814 33.391,15.907 34.718,15.907 ; U7.5@37.675,6.05 37.678,6.047 39.056,6.047 C25.2@39.059,6.044 39.059,3.056 C24.2@39.015,3.012
  Top Layer w0.4: U6.3@34.795,20.45 33.684,20.45 33.45,20.216 33.45,18.85 33.75,18.55 U6.1@34.795,18.55 34.878,18.55 34.928,18.5 34.928,15.735 C9.1@35.076,15.588 ; U6.3@35.044,20.459 C11.1@36.827,20.459 ; D3.1@36.275,26.515 36.298,26.515 36.538,26.275 36.538,24.884 36.59,24.832 36.59,24.375 36.535,24.32 36.535,22.415 C5.2@36.725,22.225 36.535,22.035 36.535,20.61 36.685,20.46 C11.1@36.827,20.46 ; C11.1@36.695,20.526 C4.2@38.188,20.526 ; C4.2@38.388,20.501 C4.2@38.456,20.569
  signal w0.254: v1@9.242,17.391 9.242,13.075 ; v1(22.824,16.288) 22.813,16.277 22.813,15.985 19.903,13.075 9.242,13.075 ; v1(33.95,13.875) 39.802,8.023 39.802,3.191 39.62,3.01 v1(39.62,2.97) 37.325,0.675 10.975,0.675 9.242,2.408 9.242,13.075
  other v1: 9.23,17.404
-5V: C18.1 C33.1 R9.1 U4.6 U11.22 | length 9.6
  Top Layer w0.2: U11.22@16.775,12.178 16.775,12.523 C33.1@17.488,13.27 ; C33.1@17.575,13.425 17.62,13.47 23.816,13.47 C18.1@23.906,13.559 23.929,13.536 24.027,13.438 24.523,13.438 R9.1@24.641,13.556 ; C18.1@23.949,13.556 23.999,13.606 23.999,14.41 24.038,14.45 U4.6@24.135,14.45
\: R28.1 U3.26 | length 1.5
  Top Layer w0.2: U3.26@20.984,26.186 R28.1@22.406,26.186 ; R28.1@22.357,26.061 R28.1@22.406,26.109
CH340_XI: C6.1 U1.7 U2.1 | length 5.5
  Top Layer w0.1: U1.7@25.918,28.409 U1.7@25.971,28.356
  Top Layer w0.15: C6.1@25.777,30.228 25.675,30.329 25.675,32.816 25.734,32.875 26.25,32.875 U2.1@26.625,33.25 ; U1.7@25.918,28.409 C6.1@25.918,30.028
CH340_XO: C7.1 U1.8 U2.3 | length 3
  Top Layer w0.15: U2.3@24.425,31.55 24.829,31.146 24.829,30.479 C7.1@24.84,30.467 ; U1.8@24.701,28.356 24.73,28.386 C7.1@24.73,30.065
DA_EN: U3.25 U7.4 | length 32.6
  Top Layer w0.2: v1(20.975,25.25) 20.975,25.648 21.012,25.685 U3.25@21.27,25.685
  signal w0.15: v1(20.975,25.25) 21.386,25.661 26.452,25.661 26.991,25.122 26.991,16.634 33.775,9.85 33.775,6.425 36.058,4.142 v1(36.834,4.142)
DCIN: 
DPDT_CTL2: R29.1 U3.27 | length 1.4
  Top Layer w0.2: U3.27@20.984,26.686 R29.1@22.407,26.686
EN-: U3.20 U4.8 | length 20.6
  Top Layer w0.2: U4.8@26.015,14.95 26.042,14.923 26.556,14.923 v1(26.583,14.896)
  Top Layer w0.3: U3.20@17.423,24.136 17.424,24.137 v1(17.425,25.3) v1(17.425,25.3)
  signal w0.15: v1(17.425,25.3) 17.425,24.688 17.513,24.6 21.325,24.6 22.064,25.339 23.634,25.339 26.4,22.573 26.4,15.109 26.583,14.926 v1(26.583,14.896)